# Altium PCB nrf_400708.PcbDoc (part 6 of 6)
Units mm, origin at the board's own origin, x right, y up, seen from the top; angles counter-clockwise.
Board outline 117 x 63.5 mm, 4 copper layers (Top Layer, Mid-Layer 1, Mid-Layer 2, Bottom Layer), stack 1.556 mm thick; 226 components, 168 nets, 912 pads, 2002 vias.
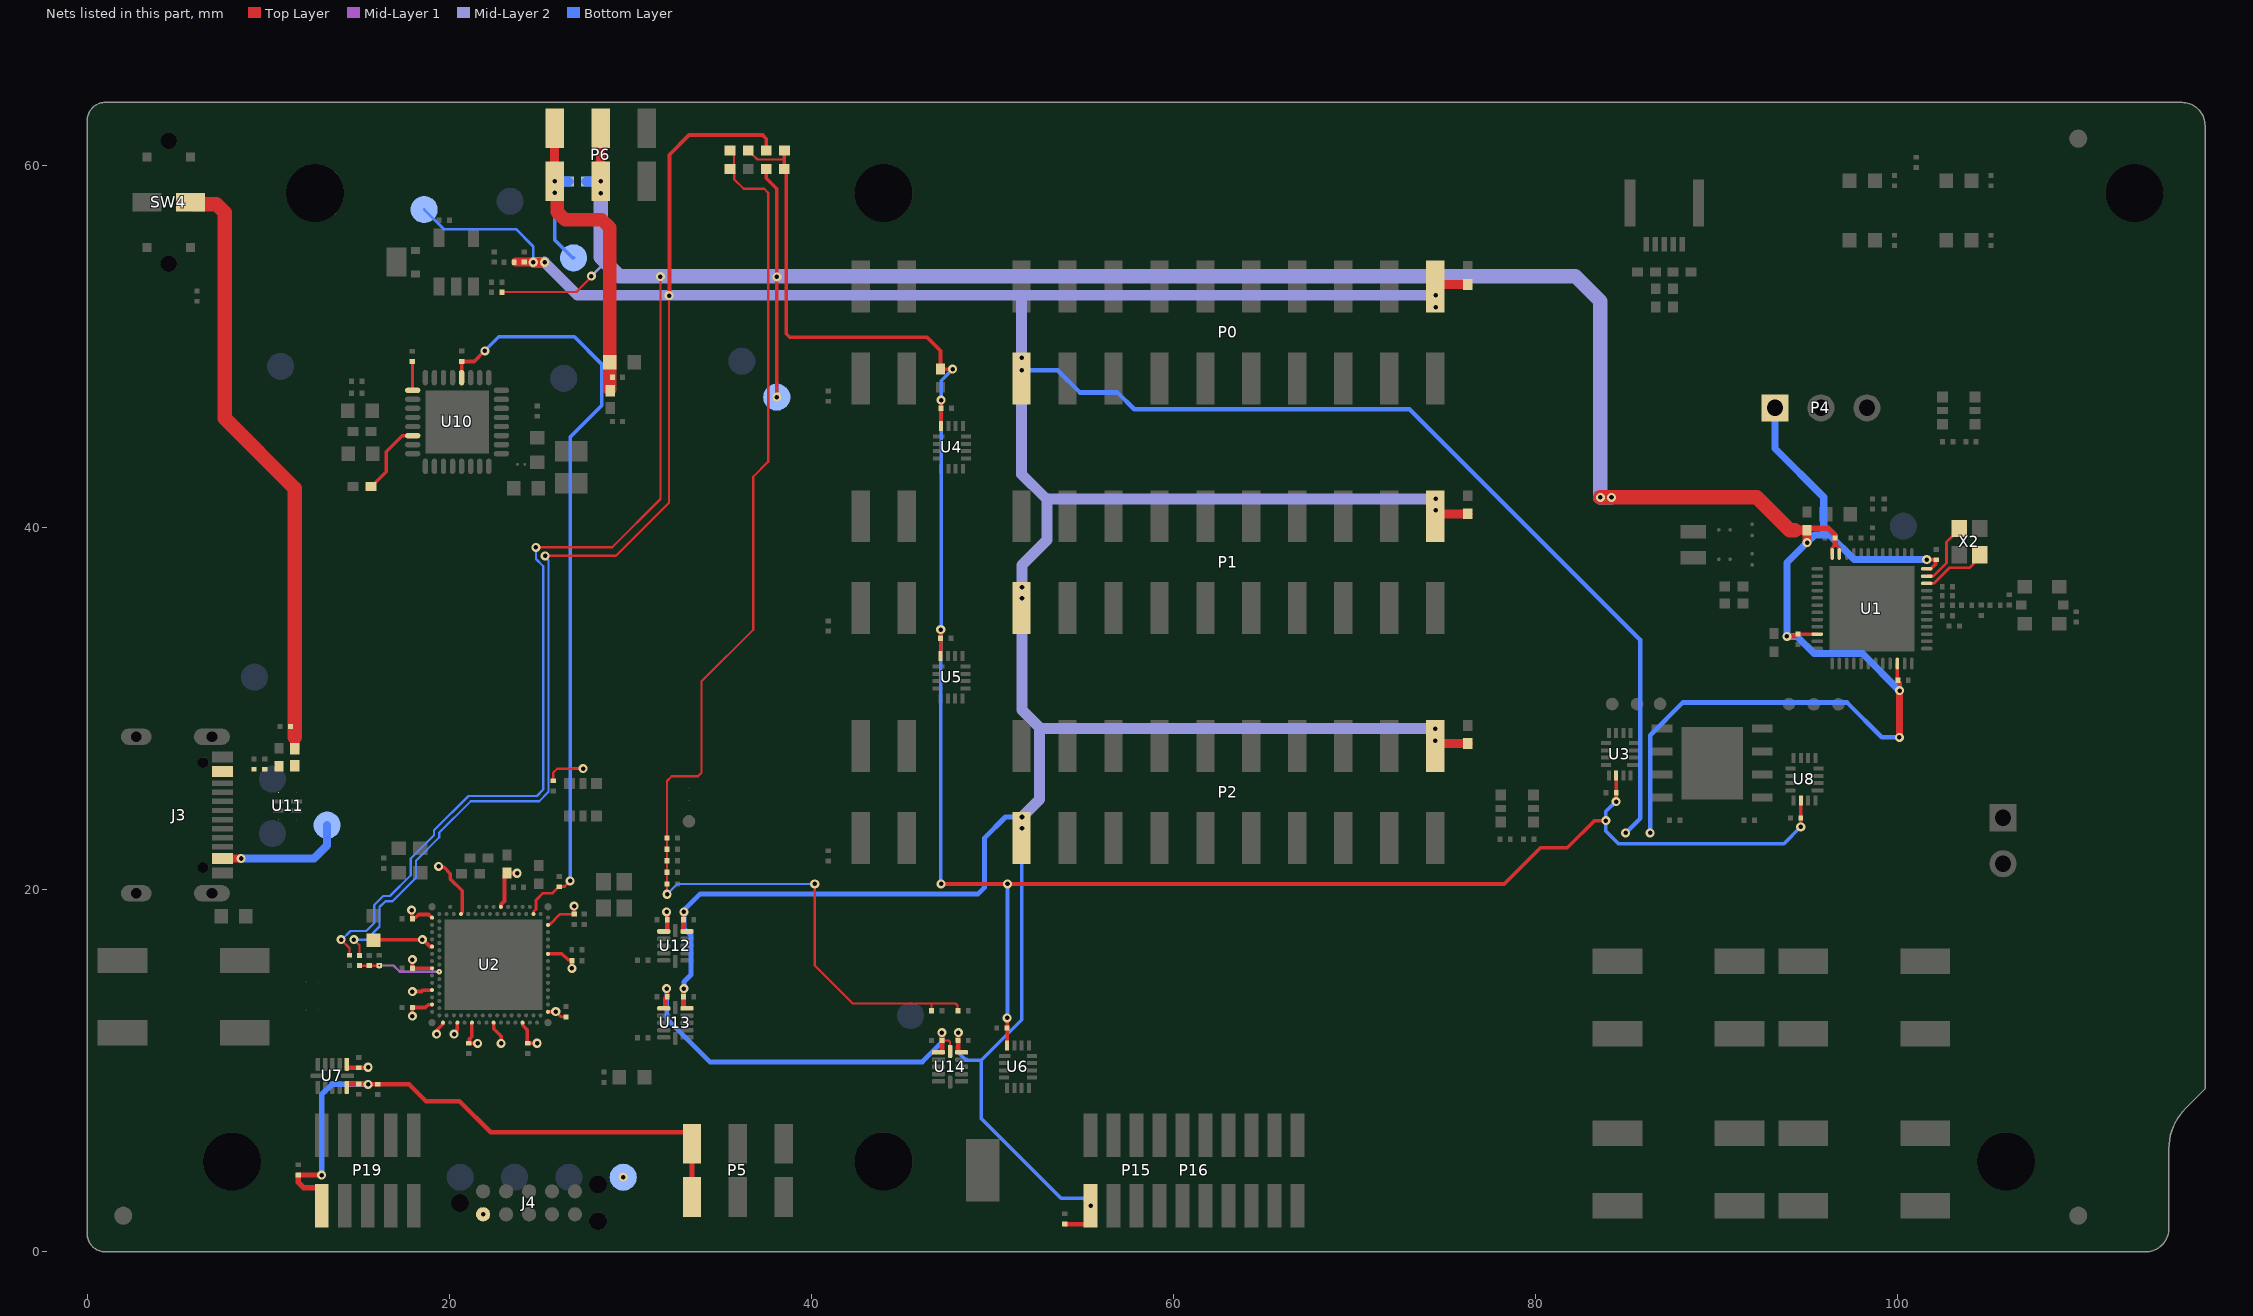
[diagram p6: the nets of this part, all layers, seen from the top]

## Via types
v1: diameter 0.5, hole 0.25, Top Layer to Bottom Layer, tented both sides, 1905 vias
v2: diameter 0.3, hole 0.1, Top Layer to Mid-Layer 1, tented top, 77 vias
v3: diameter 0.3, hole 0.1, Top Layer to Mid-Layer 1, tented both sides, 20 vias

## Nets (pads, with @x,y where several pads share a name; then routed paths per layer and width w, separated by ;. In a path a pad name is that pad's centre, name@x,y a point inside that pad or via, vN(x,y) a via of type N, cw(c..) or ccw(c..) an arc to the next point about the centre after c; other vN are vias at no path point) (continued)
VBUS:IN1: C30.1 C47.2 C48.2 FB2.1 J3.A4 J3.A9 TP16.1 U11.1 | length 7.2
  Top Layer w0.45: J3.A9@7.485,21.734 7.487,21.732 v1(8.517,21.732)
  Bottom Layer w0.45: v1(8.517,21.732) 8.519,21.73 12.548,21.73 13.263,22.446 TP16.1@13.263,23.571
VBUS:IN2: C46.2 FB2.2 SW4.5 | length 33.3
  Top Layer w0.5: FB2.2@11.475,27.8 11.475,28.423
  Top Layer w0.8: SW4.5@5.721,57.988 5.821,57.888 7.131,57.888 7.6,57.42 7.6,46.05 11.475,42.175 11.475,29.025 11.475,28.423
VBUSOUT: C68.2 U10.22 | length 4.1
  Top Layer w0.2: C68.2@15.702,42.275 16.525,43.098 16.525,44.202 17.408,45.086 17.981,45.086 U10.22@17.992,45.096
VDD: C25.2 C58.1 FB3.2 P6.3 R24.2 TP9.1 | length 22.4
  Top Layer w0.3: v1(25.832,58.5) v1(25.832,59.141)
  Top Layer w0.5: v1(25.832,59.141) P6.3@25.832,62.071
  Top Layer w0.75: v1(25.832,58.5) 25.888,58.5 25.967,58.421 25.967,57.464 26.406,57.025 28.436,57.025 28.875,56.586 C58.1@28.875,49.139 ; FB3.2@28.887,47.665 28.887,48.321 C58.1@28.887,49.139
  Bottom Layer w0.2: v1(25.832,58.5) 25.832,55.901 26.818,54.915 TP9.1@26.877,54.915
  Bottom Layer w0.55: v1@25.826,59.141 v1(25.832,59.141) ; v1(25.832,58.5) v1(25.832,59.141) ; R24.2@26.599,59.141 v1(25.832,59.141)
VDD:DBGR: C13.1 C18.1 C20.1 C22.1 C29.1 C31.1 C34.1 C35.1 C36.1 C37.1 C40.1 C53.2 C74.1 C76.1 C78.1 J4.1 R6.2 R8.2 TP3.1 U2.A19 U2.AC1 U2.AG1 U2.AJ31 U2.AL3 U2.AL7 U2.AL11 U2.AL17 U2.AL25 U2.B8 U2.B28 U2.C1 U2.E31 U2.L1 U2.N31 U2.U1 U7.1 U10.12 U12.1 U13.1 U14.1 U14.12 | length 96.4
  Top Layer w0.125: R8.2@25.76,26.025 25.76,26.479 25.975,26.694 v1(27.4,26.694) ; C78.1@47.224,11.679 47.602,11.679 47.675,11.606 U14.12@47.675,11.075
  Top Layer w0.15: U2.B28@24.66,18.664 24.675,18.679 24.675,18.801 24.798,18.925 24.798,19.204 24.798,19.427 25.185,19.815 25.722,19.815 26.081,20.174 C37.1@26.096,20.174 26.11,20.188 26.383,20.188 v1(26.685,20.49) ; U2.E31@25.443,18.079 25.562,18.079 25.824,18.341 25.824,18.364 26.102,18.642 26.125,18.642 26.134,18.651 26.899,18.651 C36.1@26.909,18.661 ; v1(25.893,13.271) 26.173,12.991 26.454,12.991 R6.2@26.46,12.986
  Top Layer w0.187: v1(19.425,21.3) 19.485,21.24 19.735,21.24 20.075,20.9 20.075,20.6 20.735,19.94 20.735,18.75 20.66,18.675 U2.B8@20.66,18.664 ; U2.N31@25.46,16.464 26.236,16.464 26.572,16.128 C35.1@26.691,16.128
  Top Layer w0.2: C40.1@16.018,17.25 v1(18.525,17.25) 18.562,17.25 18.943,16.869 19.055,16.869 U2.L1@19.06,16.864 ; v1(17.925,18.875) 17.949,18.851 17.949,18.426 C13.1@17.974,18.401 17.974,18.416 18.009,18.451 18.134,18.451 18.325,18.642 18.883,18.642 U2.C1@19.06,18.464 ; v1(17.968,13.03) 17.968,13.471 17.98,13.471 18.009,13.499 18.682,13.499 18.842,13.66 19.055,13.66 U2.AG1@19.06,13.664 ; v1(17.968,14.381) 17.976,14.388 18.481,14.388 18.558,14.464 U2.AC1@19.06,14.464 ; C18.1@17.974,15.63 v1@17.974,16.149 ; C18.1@17.979,15.664 U2.U1@19.06,15.664 ; v1(19.314,12.026) 19.372,12.083 19.372,12.296 19.655,12.58 19.655,12.66 U2.AL3@19.66,12.664 ; v1(20.279,12.026) 20.279,12.107 20.46,12.288 U2.AL7@20.46,12.664 ; U10.12@20.7,48.304 C29.1@20.7,49.19 21.39,49.19 v1(21.975,49.775) ; C22.1@21.092,11.524 21.127,11.559 21.13,11.559 21.13,11.759 21.26,11.889 U2.AL11@21.26,12.664 ; C22.1@21.101,11.521 21.572,11.521 v1(21.575,11.518) ; U2.AL17@22.46,12.664 22.46,12.334 22.878,11.916 v1(22.878,11.518) ; U2.AL25@24.06,12.664 24.065,12.66 24.065,12.514 24.318,12.261 24.318,11.549 C34.1@24.343,11.524 24.346,11.521 24.856,11.521 v1(24.86,11.525) ; U2.AJ31@25.46,13.264 25.887,13.264 v1(25.893,13.271) ; C35.1@26.691,16.128 26.748,16.128 26.783,16.093 C35.1@26.783,16.078 v1(26.782,15.659)
  Top Layer w0.203: v1(26.907,19.101) 26.909,19.1 C36.1@26.909,18.661
  Top Layer w0.225: U2.A19@22.86,19.064 22.86,19.179 23.073,19.392 23.073,20.848 C31.1@23.15,20.924 ; C31.1@23.2,20.916 v1(23.759,20.916)
  Top Layer w0.27: U7.1@14.362,10.174 C53.2@15.004,10.174 15.499,10.174 v1(15.525,10.2) ; v1(32.023,14.539) 32.051,14.51 C76.1@32.051,14.104 31.948,14.001 31.948,13.564 U13.1@32.051,13.462 ; v1(32.023,18.789) 32.051,18.76 C74.1@32.051,18.354 U12.1@32.051,17.712 ; U14.1@47.226,11.037 C78.1@47.224,11.679 v1(47.226,12.114)
  Mid-Layer 1 w0.2: v1@21.541,11.484 v1(21.575,11.518) v1@21.632,11.461
  Bottom Layer w0.125: 26.685,26.694 v1(27.4,26.694)
  Bottom Layer w0.2: v1(21.575,11.518) v1@21.656,11.518 ; v1(21.975,49.775) 22.75,50.55 26.925,50.55 28.425,49.05 28.425,46.739 26.685,44.999 26.685,26.694 v1(26.685,20.49)
  Bottom Layer w0.27: v1(32.023,14.539) 32.023,12.876 34.4,10.498 46.148,10.498 47.226,11.576 v1(47.226,12.114)
  other v1: 21.878,2.074 29.62,4.125 17.975,16.15
VDD:IO: C16.2 C28.2 C51.2 C63.2 C75.1 C77.1 C79.1 P0.1 P0.20 P1.1 P1.20 P2.1 P2.20 P15.1 P16.1 R9.2 R25.1 R37.2 R41.2 SB9.1 TP11.1 U12.11 U13.11 U14.11 | length 319.5
  Top Layer w0.125: v1(14.742,17.25) 15.053,16.939 R41.2@15.053,16.384 ; v1(25.3,38.45) 29.209,38.45 32.15,41.391 v1(32.15,52.825)
  Top Layer w0.2: R37.2@24.142,54.675 R37.2@24.144,54.672 ; v1@24.647,54.672 v1(24.65,54.67) ; v1(32.15,52.825) 32.175,52.85 32.175,60.615 33.26,61.7 37.318,61.7 37.525,61.493 R25.1@37.525,60.85
  Top Layer w0.25: C63.2@54,1.54 55.438,1.54 v1(55.438,2.55) ; P0.20@74.484,53.34 P0.20@74.484,54.215 ; v1(74.485,28.243) P2.20@74.485,28.815 ; v1(74.504,40.97) P1.20@74.504,41.515
  Top Layer w0.27: U13.11@32.948,13.514 32.952,14.094 32.952,14.516 v1(32.975,14.539) ; U12.11@32.948,17.764 C75.1@32.948,18.354 v1@32.948,18.789 ; U14.11@48.123,11.089 48.127,11.679 v1(48.13,12.114) C79.1@48.123,11.679
  Top Layer w0.5: R9.2@23.669,54.674 R37.2@24.142,54.675 24.645,54.674 v1@24.647,54.672 ; v1@24.652,54.672 v1(25.278,54.672) ; P0.20@74.484,53.34 74.594,53.45 C28.2@76.275,53.45 ; P2.20@74.594,28.076 C51.2@76.275,28.076 ; P1.20@74.594,40.775 C16.2@76.275,40.775
  Mid-Layer 2 w0.6: v1(24.65,54.67) 24.652,54.672 v1(25.278,54.672) ; v1@25.275,54.675 v1(25.278,54.672) ; v1@32.125,52.85 27.1,52.85 v1(25.278,54.672) ; v1@32.17,52.845 v1(74.51,52.845) v1@74.51,52.21 ; 51.629,52.825 v1(51.629,49.403) v1(51.629,48.712) 51.629,42.961 52.904,41.686 ; v1@51.644,23.4 51.644,23.377 v1@51.649,23.381 ; v1(51.65,23.4) v1(51.65,24.025) 52.625,25 52.625,28.871 ; v1(51.65,36.1) 51.649,29.933 52.677,28.905 ; v1(51.65,36.1) v1(51.65,36.725) 51.65,37.95 53.025,39.325 53.025,41.613 ; 52.709,28.905 v1(74.484,28.905) ; 53.055,41.595 v1(74.504,41.595) v1(74.504,40.97) ; v1(74.485,28.243) v1(74.484,28.905)
  Bottom Layer w0.125: v1(14.742,17.25) 15.438,17.25 16.162,17.974 16.162,19.049 16.488,19.375 16.875,19.375 18.175,20.675 18.175,21.614 19.462,22.901 19.462,23.167 21.195,24.9 24.975,24.9 25.488,25.413 25.488,38.189 25.3,38.377 v1(25.3,38.45)
  Bottom Layer w0.15: TP11.1@18.622,57.582 19.704,56.5 23.7,56.5 24.65,55.55 v1(24.65,54.67)
  Bottom Layer w0.2: v1(48.13,12.114) 48.13,11.009 48.554,10.585 49.4,10.585 ; v1@51.644,24.025 51.644,12.83 49.4,10.585 ; v1(55.438,2.55) 55.03,2.958 53.809,2.958 49.4,7.368 49.4,10.585
  Bottom Layer w0.25: v1(51.629,48.712) 53.613,48.712 54.85,47.475 56.925,47.475 57.85,46.55 73.057,46.55 85.8,33.807 85.8,23.945 v1(84.997,23.142)
  Bottom Layer w0.27: v1(32.975,14.539) 32.979,14.543 32.979,14.92 33.363,15.304 33.363,17.5 32.975,17.889 v1(32.975,18.789) 32.975,18.875 33.875,19.775 49.225,19.775 49.575,20.125 49.575,22.859 50.741,24.025 51.644,24.025 v1(51.65,24.025)
  other v1: 74.5,52.175
VDD:nRF: C3.2 C4.1 C7.1 C8.1 C11.1 P4.1 P6.2 R23.2 R24.1 R28.1 R43.1 SB10.1 TP1.1 U1.10 U1.22 U1.36 U1.47 U1.48 | length 219.6
  Top Layer w0.125: v1(14.04,17.25) 14.5,16.79 R23.2@14.5,16.385 ; R43.1@22.92,53.025 27.025,53.025 v1@27.894,53.894 ; v1(24.8,38.925) 29.013,38.925 31.675,41.587 v1(31.675,53.875)
  Top Layer w0.2: R28.1@37.519,59.83 37.519,59.31 38.104,58.725 v1(38.104,53.863) v1(38.104,47.219) ; C7.1@94.503,34.134 C7.1@94.518,34.134 ; C7.1@94.523,34.13 U1.10@95.58,34.13 ; U1.48@96.405,38.555 96.405,38.906 96.581,39.082 ; C11.1@96.542,39.474 C11.1@96.577,39.439 ; 96.597,39.098 96.805,38.889 U1.47@96.805,38.555 ; C8.1@100.005,31.568 U1.22@100.005,32.505 ; C8.1@100.034,31.518 C8.1@100.034,31.533 ; U1.36@101.63,37.73 101.855,37.73 101.855,37.732 102.114,37.99 C4.1@102.114,38.178 ; v1(101.63,38.244) 101.639,38.235 102.126,38.235 C4.1@102.149,38.213
  Top Layer w0.25: v1(93.909,34.002) 93.931,34.024 94.393,34.024 C7.1@94.503,34.134 ; C8.1@100.034,31.518 100.132,31.42 v1(100.132,31.005)
  Top Layer w0.3: v1(28.372,58.493) v1(28.372,59.141) ; C3.2@95.128,39.966 96.196,39.966 96.581,39.58 96.581,39.082 ; v1@100.125,30.998 v1(100.132,31.005)
  Top Layer w0.4: v1(100.125,28.425) v1@100.125,30.998
  Top Layer w0.5: v1(28.372,59.141) P6.2@28.372,62.071 ; v1(95.017,39.186) C3.2@95.017,39.867
  Top Layer w0.55: 94.35,39.867 C3.2@95.017,39.867
  Top Layer w0.8: v1(83.607,41.68) v1(84.216,41.68) 92.245,41.68 94.058,39.867 94.35,39.867
  Mid-Layer 2 w0.15: v1(27.862,53.9) 28.372,54.41 28.372,54.937
  Mid-Layer 2 w0.8: v1(28.372,59.141) v1(28.372,58.493) 28.372,54.937 29.409,53.9 v1@31.65,53.9 ; v1@31.7,53.9 82.225,53.9 83.607,52.518 v1(83.607,41.68) v1(84.216,41.68)
  Bottom Layer w0.125: v1(14.04,17.25) 14.075,17.25 14.55,17.725 15.425,17.725 15.871,18.171 15.871,19.169 16.367,19.665 16.739,19.665 17.881,20.807 17.881,21.731 19.171,23.021 19.171,23.287 21.075,25.19 24.854,25.19 25.202,25.538 25.202,37.873 24.8,38.275 v1(24.8,38.925)
  Bottom Layer w0.25: v1(86.347,23.142) 86.347,28.547 88.15,30.35 97.225,30.35 99.15,28.425 v1(100.125,28.425)
  Bottom Layer w0.3: 93.909,35.496 93.921,35.484
  Bottom Layer w0.4: P4.1@93.245,46.625 93.245,44.38 95.935,41.69 95.935,39.606 ; v1(93.909,34.002) 94.465,34.002 95.412,33.055 98.081,33.055 v1(100.132,31.005) ; v1@93.909,34.048 93.909,35.496 93.909,38.078 v1(95.017,39.186) 95.437,39.606 95.935,39.606 ; v1@101.603,38.244 97.62,38.244 96.258,39.606 95.935,39.606
  Bottom Layer w0.55: R24.1@27.599,59.141 v1(28.372,59.141) v1(28.372,58.493)
VDD:SW: C10.1 C15.1 C49.1 C50.2 C65.1 C66.1 R25.2 R28.2 R29.2 U3.14 U4.16 U5.16 U6.16 U8.14 | length 118.2
  Top Layer w0.125: R29.2@36.525,60.85 36.55,60.85 36.762,60.638 36.762,60.613 37.034,60.341 38.519,60.341 ; R25.2@38.287,60.638 38.5,60.85 R25.2@38.525,60.85
  Top Layer w0.2: R28.2@38.519,59.83 38.519,60.341 R25.2@38.519,60.836 ; R28.2@38.625,59.83 38.625,50.727 38.827,50.525 46.4,50.525 47.15,49.775 C50.2@47.15,48.769 v1(47.819,48.769) ; U5.16@47.16,32.911 47.16,33.911 47.154,33.917 47.154,34.369 v1(47.16,34.375) ; v1(47.178,20.325) v1(50.849,20.325) 78.288,20.325 80.288,22.325 81.775,22.325 83.275,23.825 v1(83.9,23.825) ; U4.16@47.178,45.612 47.178,46.603 C10.1@47.182,46.607 v1(47.182,47.056) ; U6.16@50.825,11.4 C49.1@50.825,12.369 v1(50.825,12.925) ; v1(84.47,24.878) 84.47,25.365 84.475,25.371 U3.14@84.475,26.325 ; v1(94.67,23.479) 94.67,23.965 94.675,23.971 U8.14@94.675,24.925
  Bottom Layer w0.2: v1@47.164,20.325 47.164,34.371 v1(47.16,34.375) 47.182,34.396 v1(47.182,47.056) 47.182,48.131 v1(47.819,48.769) ; v1(50.825,12.925) 50.849,12.949 v1(50.849,20.325) ; v1@84.462,24.887 83.9,24.325 v1(83.9,23.825) 83.9,23.25 84.6,22.55 93.741,22.55 v1(94.67,23.479)
VDD:SW_PU: R13.1 R14.1 R15.1 R16.1 R17.2 R29.1 R30.1 R31.1 R35.2 | length 68.4
  Top Layer w0.125: v1(32.04,19.756) R13.1@32.04,20.325 R15.1@32.04,21.605 R16.1@32.04,22.237 R35.2@32.04,22.864 ; R35.2@32.04,22.9 32.04,26.015 32.3,26.275 33.75,26.275 33.95,26.475 33.95,31.525 36.8,34.375 36.8,42.828 37.625,43.653 37.625,58.516 37.416,58.725 36.275,58.725 35.751,59.249 35.751,59.617 35.539,59.83 R30.1@35.525,59.83 35.533,59.83 35.746,60.042 35.746,60.638 35.533,60.85 R29.1@35.525,60.85 ; v1(40.2,20.325) 40.2,15.825 42.3,13.725 46.656,13.725 ; R17.2@46.654,13.325 46.654,13.723 46.656,13.725 ; R31.1@48.11,13.325 48.09,13.345 48.09,13.609 47.974,13.725 46.656,13.725
  Bottom Layer w0.125: v1(32.04,19.756) 32.609,20.325 v1(40.2,20.325)
VDD:SWD0: C14.1 C73.2 P5.3 P19.1 R18.2 U7.11 | length 34.7
  Top Layer w0.15: v1(15.525,9.25) v1@15.531,9.256 ; R18.2@16.058,9.256 R18.2@16.064,9.262
  Top Layer w0.25: v1(15.525,9.25) 16.058,9.25 17.8,9.25 18.725,8.325 20.575,8.325 22.3,6.6 33.035,6.6 33.42,6.215 P5.3@33.42,5.965 P5.3@33.42,3.035
  Top Layer w0.27: U7.11@14.411,9.275 14.414,9.277 C14.1@15.004,9.277 15.498,9.277 v1(15.525,9.25)
  Top Layer w0.3: P19.1@12.964,2.55 12.964,3.32 12.734,3.55 11.964,3.55 11.679,3.835 C73.2@11.679,4.246 v1(12.964,4.246)
  Bottom Layer w0.3: v1(12.964,4.246) 12.964,8.689 13.525,9.25 v1(15.525,9.25)
VMEAS_CH1: C67.1 R41.1 R42.2 U2.V2 | length 4.5
  Top Layer w0.125: R41.1@15.053,15.814 16.143,15.814 v2(16.145,15.815)
  Mid-Layer 1 w0.125: v2(16.145,15.815) 16.935,15.815 17.27,15.48 v2(19.46,15.48)
VSET1: R26.1 U10.17 | length 1.9
  Top Layer w0.15: U10.17@17.742,47.665 17.811,47.596 U10.17@17.992,47.596 17.974,47.614 R26.1@17.974,49.183
XC1: U1.34 X2.1 | length 3.6
  Top Layer w0.15: U1.34@101.691,36.94 102.028,36.94 102.875,37.786 103.993,37.786 104.218,38.011 104.218,38.159 X2.1@104.568,38.509
XC2: U1.35 X2.3 | length 3.6
  Top Layer w0.15: U1.35@101.63,37.33 101.64,37.34 102.004,37.34 102.723,38.058 102.723,39.209 103.068,39.554 103.068,39.609 X2.3@103.418,39.959
pads on no net: Fid1.0 Fid2.0 Fid3.0 J3. J3.0 J3.A8 J3.B8 J4.0 J4.6 J4.7 J4.8 J4.9 J7.0 J7.1 J7.3 J7.5 P0.8 P0.9 P0.10 P0.11 P0.12 P0.13 P0.14 P0.15 P0.16 P0.17 P0.18 P1.18 P2.14 P2.15 P2.16 P2.17 P2.18 P5.2 P15.7 P15.8 P16.7 P16.8 P16.11 P16.13 P19.7 P19.8 P19.9 P30.3 P31.3 P32.3 SW4.0 SW4.1 SW4.6 U2. U2.A1 U2.A21 U2.A31 U2.AD2 U2.AE31 U2.AG31 U2.AH2 U2.AK2 U2.AK4 U2.AK6 U2.AK8 U2.AK10 U2.AK12 U2.AK14 U2.AK22 U2.AK24 U2.AK26 U2.AK28 U2.AK30 U2.AL1 U2.AL31 U2.B10 U2.D2 U2.F2 U2.J1 U2.K2 U2.M2 U2.P2 U2.T2 U2.Y2 U4.7 U4.12 U5.7 U5.12 U6.7 U6.12 U10.5 U10.7 U10.9 U10.10 U10.11 U10.15 U10.18 U10.19 U10.25 U10.26 U10.27 U11.4

## Polygon pours and split planes (outlines as drawn)
P5V0 on Top Layer "P5V0" (solid, remove dead copper, pour order 0): 16.496,48.5 16.496,50.01 17.748,51.263 17.748,59.646 17.294,60.1 14.15,60.1 10.475,56.425 10.475,49.451 11.426,48.5
GND on Top Layer "GND_island" (solid, pour order 4): 103.874,35.423 103.874,34.914 104.306,34.482 104.991,34.482 105.397,34.888 105.397,35.422
GND on Top Layer "Top_Layer-GND" (solid, remove dead copper, pour order 10): 0.002,0.009 0.002,63.509 117.004,63.509 117.004,0.009
GND on Mid-Layer 1 "Mid_Layer1-GND" (solid, remove dead copper, pour order 1): 0.029,0 0.029,63.22 117.004,63.22 117.004,0
GND on Bottom Layer "Bottom_Layer-GND" (solid, remove dead copper, pour order 3): 0.029,0 0.029,63.5 117.004,63.5 117.004,0
VDD:DBGR on Mid-Layer 2 "VDD_DBGR" (solid, pour order 6): 21.754,1.825 25.2,1.825 26.025,2.65 29.176,2.65 30.011,3.485 30.011,4.789 28.85,5.95 28.85,11 32.25,14.4 32.25,18.875 29.675,21.45 19,21.45 17.725,20.175 17.725,14.809 15.175,12.259 15.175,10.025 15.325,9.875 21.219,3.981 21.219,2.36
GND on Mid-Layer 2 "Mid_Layer2-GND" (solid, remove dead copper, pour order 7): 0.029,0 0.029,63.5 117.004,63.5 117.004,0

## Keep-outs
Top Layer:
  region: 112,26.473 cw(c112,29.973) 108.5,29.973 cw(c112,29.973) 112,33.473 cw(c112,29.973) 115.5,29.973 cw(c112,29.973)
  region: 108.496,6.473 cw(c108.496,9.973) 104.996,9.973 cw(c108.496,9.973) 108.496,13.473 cw(c108.496,9.973) 111.996,9.973 cw(c108.496,9.973)
  region: 42.496,14.473 cw(c42.496,17.973) 38.996,17.973 cw(c42.496,17.973) 42.496,21.473 cw(c42.496,17.973) 45.996,17.973 cw(c42.496,17.973)
  region: 74.996,0.473 cw(c74.996,3.973) 71.496,3.973 cw(c74.996,3.973) 74.996,7.473 cw(c74.996,3.973) 78.496,3.973 cw(c74.996,3.973)
  region: 3.496,-0.027 cw(c3.496,3.473) -0.004,3.473 cw(c3.496,3.473) 3.496,6.973 cw(c3.496,3.473) 6.996,3.473 cw(c3.496,3.473)
  region: 20.496,33.473 cw(c20.496,36.973) 16.996,36.973 cw(c20.496,36.973) 20.496,40.473 cw(c20.496,36.973) 23.996,36.973 cw(c20.496,36.973)
  region: 16.496,56.973 cw(c16.496,60.473) 12.996,60.473 cw(c16.496,60.473) 16.496,63.973 cw(c16.496,60.473) 19.996,60.473 cw(c16.496,60.473)
  region: 35.496,52.473 cw(c35.496,55.973) 31.996,55.973 cw(c35.496,55.973) 35.496,59.473 cw(c35.496,55.973) 38.996,55.973 cw(c35.496,55.973)
  region: 77.796,54.973 cw(c77.796,58.473) 74.296,58.473 cw(c77.796,58.473) 77.796,61.973 cw(c77.796,58.473) 81.296,58.473 cw(c77.796,58.473)
  region: 46.352,19.687 ccw(c49.352,19.687) 49.352,16.687 ccw(c49.352,19.687) 52.352,19.687 ccw(c49.352,19.687) 49.352,22.687 ccw(c49.352,19.687)
  region: 8.004,2 cw(c8.004,5) 5.004,5 cw(c8.004,5) 8.004,8 cw(c8.004,5) 11.004,5 cw(c8.004,5)
  region: 44.004,2 cw(c44.004,5) 41.004,5 cw(c44.004,5) 44.004,8 cw(c44.004,5) 47.004,5 cw(c44.004,5)
  region: 106.005,1.979 cw(c106.005,4.979) 103.005,4.979 cw(c106.005,4.979) 106.005,7.979 cw(c106.005,4.979) 109.005,4.979 cw(c106.005,4.979)
  region: 98.967,25.576 cw(c98.967,28.576) 95.967,28.576 cw(c98.967,28.576) 98.967,31.576 cw(c98.967,28.576) 101.967,28.576 cw(c98.967,28.576)
  region: 113.104,55.5 cw(c113.104,58.5) 110.104,58.5 cw(c113.104,58.5) 113.104,61.5 cw(c113.104,58.5) 116.104,58.5 cw(c113.104,58.5)
  region: 44.004,55.5 cw(c44.004,58.5) 41.004,58.5 cw(c44.004,58.5) 44.004,61.5 cw(c44.004,58.5) 47.004,58.5 cw(c44.004,58.5)
  region: 16.439,59.569 cw(c16.439,62.569) 13.439,62.569 cw(c16.439,62.569) 16.439,65.569 cw(c16.439,62.569) 19.439,62.569 cw(c16.439,62.569)
Keep-Out Layer:
  circle w0.152: c12.604,58.5 r2.4
  circle w0.152: c113.104,58.5 r2.4
  circle w0.152: c113.104,58.5 r2.4
  circle w0.152: c106.004,5 r2.4
  circle w0.152: c44.004,5 r2.4
  circle w0.152: c44.004,58.5 r2.4
  circle w0.152: c8.004,5 r2.4

## Other copper
Top Layer:
  rectangle net GND: 6.919,27.025 8.804,27.85
  rectangle net GND: 109.224,34.036 110.038,34.931
  rectangle net GND: 6.891,20.422 8.776,21.247
  rectangle net ANT: 115.025,16.986 116.295,17.748
  pour cut-out: 8.2,23.75 10.573,23.75 10.573,24.279 8.2,24.279 8.2,24.047
  pour cut-out: 25.839,43.656 25.839,43.016 27.809,43.016 27.809,43.656
  region net RF: 106.555,35.98 106.35,35.865 106.35,35.595 106.555,35.48
  region net PVSS1: 22.892,44.446 23.264,44.446 23.499,44.211 23.499,43.936 23.199,43.636 23.199,41.786 23.949,41.786 23.949,42.536 24.65,43.237 25.267,43.237 25.267,43.996 24.164,43.996 23.414,44.746 22.892,44.746
  region net P5V0: 15.382,45.946 15.382,48.629 17.367,48.629 17.367,46.334 17.454,46.246 18.042,46.246 18.042,45.946
  region net NetC27_2: 24.549,42.586 25.69,42.586 25.817,42.713 25.817,43.016 27.652,43.016 27.652,41.589 27.474,41.411 24.549,41.411
  region net P5V0: 23.603,45.459 24.467,44.596 25.267,44.596 25.267,46.296 24.167,46.296 23.604,45.733
  region net NetC59_1: 7.89,19.8 7.89,18.1 5.902,18.1 5.902,19.8
  pour cut-out: 103.874,35.423 103.874,34.914 104.306,34.482 104.991,34.482 105.398,34.889 105.397,34.889 105.397,35.423 105.547,35.423 105.547,34.802 105.065,34.32 104.227,34.32 103.719,34.828 103.719,35.423
  region net VBUS:IN1: 11.725,27.175 11.725,26.525 10.879,26.525 10.879,25.283 10.101,25.283 9.725,25.659 9.725,26.15 9.641,26.234 6.876,26.234 6.719,26.077 6.719,22.178 6.864,22.034 8.059,22.034 8.059,21.434 6.873,21.434 5.95,22.357 5.95,25.875 6.909,26.834 9.937,26.834 10.232,26.539 10.232,25.828 10.577,25.483 10.679,25.483 10.679,25.554 10.35,25.883 10.35,27.175
  region net NetL2_1: 102.387,35.879 101.998,35.829 101.998,35.63 102.387,35.579
  pour cut-out: 99.09,39.615 98.278,39.615 98.278,41.467 99.09,41.467
  pour cut-out: 96.858,41.292 96.649,41.292 96.649,41.179 96.858,41.179
  pour cut-out: 105.311,40.732 105.311,37.477 102.443,37.477 102.443,40.732
  pour cut-out: 102.811,36.895 102.811,36.591 102.923,36.591 102.923,36.895
Mid-Layer 1:
  pour cut-out: 33.851,25.048 32.651,25.048 32.651,25.54 33.851,25.54
  pour cut-out: 85.597,23.262 84.397,23.262 84.397,23.754 85.597,23.754
  pour cut-out: 110.038,37.125 106.927,37.125 106.302,36.5 102.775,36.5 102.775,35.324 103.7,35.324 103.7,34.95 106.302,34.95 106.927,34.325 110.038,34.325
  pour cut-out: 103.719,35.318 103.719,34.828 104.227,34.32 105.065,34.32 105.547,34.802 105.547,35.318
  pour cut-out: 89.779,39.161 89.779,40.616 91.141,40.616 91.141,39.161
  pour cut-out: 89.779,37.535 89.779,38.991 91.141,38.991 91.141,37.535
  pour cut-out: 12.225,12.775 12.225,13.975 12.717,13.975 12.717,12.775
Mid-Layer 2:
  region net P5V0: 25.168,45.289 25.278,45.415 25.278,46.113 22.766,48.625 16.8,48.625 16.8,47.005 16.93,46.875 18.454,46.875 19.029,47.45 21.896,47.45 22.125,47.221 22.125,45.396 22.233,45.287
  pour cut-out: 110.038,37.125 106.927,37.125 106.302,36.5 102.775,36.5 102.775,35.324 103.7,35.324 103.7,34.95 106.302,34.95 106.927,34.325 110.038,34.325
  pour cut-out: 103.719,35.318 103.719,34.828 104.227,34.32 105.065,34.32 105.547,34.802 105.547,35.318
Bottom Layer:
  pour cut-out: 19.572,57.582 cw(c18.62,57.582) 18.62,56.63 cw(c18.62,57.578) 17.672,57.578 17.672,57.589 cw(c18.613,57.589) 18.613,58.53 18.623,58.53 cw(c18.623,57.582)
  pour cut-out: 16.397,44.858 cw(c15.446,44.858) 15.446,43.906 cw(c15.446,44.854) 14.498,44.854 14.498,44.865 cw(c15.439,44.865) 15.439,45.806 15.449,45.806 cw(c15.449,44.858)
  pour cut-out: 20.072,29.999 cw(c19.12,29.999) 19.12,29.047 cw(c19.12,29.995) 18.172,29.995 18.172,30.006 cw(c19.113,30.006) 19.113,30.947 19.124,30.947 cw(c19.124,29.999)
  pour cut-out: 10.085,12.152 cw(c9.133,12.152) 9.133,11.2 cw(c9.133,12.149) 8.185,12.149 8.185,12.159 cw(c9.126,12.159) 9.126,13.1 9.137,13.1 cw(c9.137,12.152)
  pour cut-out: 23.027,54.815 cw(c22.075,54.815) 22.075,53.863 cw(c22.075,54.811) 21.127,54.811 21.127,54.822 cw(c22.068,54.822) 22.068,55.763 22.079,55.763 cw(c22.079,54.815)
  pour cut-out: 15.483,54.307 cw(c14.531,54.307) 14.531,53.355 cw(c14.531,54.303) 13.583,54.303 13.583,54.314 cw(c14.524,54.314) 14.524,55.255 14.535,55.255 cw(c14.535,54.307)
  pour cut-out: 32.984,37.568 cw(c32.032,37.568) 32.032,36.617 cw(c32.032,37.565) 31.084,37.565 31.084,37.576 cw(c32.025,37.576) 32.025,38.517 32.036,38.517 cw(c32.036,37.568)
  pour cut-out: 38.368,38.713 cw(c37.417,38.713) 37.417,37.761 cw(c37.417,38.71) 36.469,38.71 36.469,38.72 cw(c37.41,38.72) 37.41,39.661 37.42,39.661 cw(c37.42,38.713)
  pour cut-out: 39.869,42.397 cw(c38.918,42.397) 38.918,41.445 cw(c38.918,42.393) 37.969,42.393 37.969,42.404 cw(c38.911,42.404) 38.911,43.345 38.921,43.345 cw(c38.921,42.397)
  pour cut-out: 27.284,48.262 cw(c26.332,48.262) 26.332,47.31 cw(c26.332,48.258) 25.384,48.258 25.384,48.269 cw(c26.325,48.269) 26.325,49.21 26.336,49.21 cw(c26.336,48.262)
  pour cut-out: 14.213,38.847 cw(c13.261,38.847) 13.261,37.895 cw(c13.261,38.843) 12.313,38.843 12.313,38.854 cw(c13.254,38.854) 13.254,39.795 13.265,39.795 cw(c13.265,38.847)
  pour cut-out: 11.19,41.354 cw(c10.239,41.354) 10.239,40.403 cw(c10.239,41.351) 9.291,41.351 9.291,41.362 cw(c10.232,41.362) 10.232,42.303 10.242,42.303 cw(c10.242,41.354)
  pour cut-out: 11.19,38.354 cw(c10.239,38.354) 10.239,37.403 cw(c10.239,38.351) 9.291,38.351 9.291,38.362 cw(c10.232,38.362) 10.232,39.303 10.242,39.303 cw(c10.242,38.354)
  pour cut-out: 16.982,27.612 cw(c16.03,27.612) 16.03,26.66 cw(c16.03,27.608) 15.082,27.608 15.082,27.619 cw(c16.023,27.619) 16.023,28.56 16.034,28.56 cw(c16.034,27.612)
  pour cut-out: 22.747,27.434 cw(c21.796,27.434) 21.796,26.482 cw(c21.796,27.43) 20.848,27.43 20.848,27.441 cw(c21.789,27.441) 21.789,28.382 21.799,28.382 cw(c21.799,27.434)
  pour cut-out: 25.747,28.424 cw(c24.796,28.424) 24.796,27.473 cw(c24.796,28.421) 23.848,28.421 23.848,28.432 cw(c24.789,28.432) 24.789,29.373 24.799,29.373 cw(c24.799,28.424)
  pour cut-out: 28.747,28.424 cw(c27.796,28.424) 27.796,27.473 cw(c27.796,28.421) 26.848,28.421 26.848,28.432 cw(c27.789,28.432) 27.789,29.373 27.799,29.373 cw(c27.799,28.424)
  pour cut-out: 38.165,26.748 cw(c37.213,26.748) 37.213,25.796 cw(c37.213,26.744) 36.265,26.744 36.265,26.755 cw(c37.206,26.755) 37.206,27.696 37.217,27.696 cw(c37.217,26.748)
  pour cut-out: 38.165,21.748 cw(c37.213,21.748) 37.213,20.796 cw(c37.213,21.744) 36.265,21.744 36.265,21.755 cw(c37.206,21.755) 37.206,22.696 37.217,22.696 cw(c37.217,21.748)
  pour cut-out: 38.165,16.748 cw(c37.213,16.748) 37.213,15.796 cw(c37.213,16.744) 36.265,16.744 36.265,16.755 cw(c37.206,16.755) 37.206,17.696 37.217,17.696 cw(c37.217,16.748)
  pour cut-out: 38.165,11.748 cw(c37.213,11.748) 37.213,10.796 cw(c37.213,11.744) 36.265,11.744 36.265,11.755 cw(c37.206,11.755) 37.206,12.696 37.217,12.696 cw(c37.217,11.748)
Multi-Layer:
  pour cut-out: 110.035,0.028 117.023,0.028 116.971,63.5 110.041,63.5

## Silkscreen, mask and mechanical layers (free items; w line width, h text height)
Top Overlay:
  circle w0.15: c80.975,30.275 r1.13
  circle w0.15: c27.1,57.087 r0.884
  region: 79.619,29.08 79.619,30.304 cw(c80.99,30.304) 81.005,31.675 81.005,31.405 ccw(c80.994,30.35) 79.94,30.35 79.94,30.199 ccw(c80.994,30.199) 80.994,29.145 80.994,29.08
  region: 82.37,29.08 82.37,30.305 ccw(c81,30.304) 80.995,31.675 80.995,31.405 cw(c80.995,30.35) 82.05,30.35 82.05,30.2 cw(c80.995,30.2) 80.995,29.145 80.995,29.081
  region: 29.212,56.075 28.513,55.183 27.838,56.075
  region: 24.975,55.203 25.675,56.095 26.35,55.203
  lines w0.15: 15.875,41.75 15.875,40.767 29.075,40.767 29.075,45.4 ; 15.875,47.175 15.875,50.261 29.07,50.261 29.07,49.85 ; 15.879,15.3 15.879,11.244 20.675,11.244 ; 15.879,19.375 15.879,23.05 29.077,23.05 29.078,21.174 ; 21.539,11.244 23.851,11.244 ; 24.841,11.244 29.078,11.244 ; 29.075,11.244 29.075,18.288 ; 30.15,56.35 31.65,56.35 ; 30.45,56.1 31.35,56.1 ; 30.7,55.855 31.1,55.855 ; 30.9,56.35 30.9,57.1 ; 42.204,29.8 42.204,30.3 42.45,30.3 ; 42.204,42.5 42.204,43 42.45,43 ; 42.204,55.2 42.204,55.7 42.45,55.7 ; 45.559,30.3 45.804,30.3 45.804,29.8 ; 45.559,43 45.804,43 45.804,42.5 ; 45.559,55.7 45.804,55.7 45.804,55.2 ; 105.875,35.1 105.875,31.1 94,31.1 94,39.125 94,42.125 101.489,42.125 105.875,42.125 105.875,36.725
  lines w0.178: 25.668,56.32 25.668,56.5 ; 25.668,56.785 25.668,57.098 25.925,57.098 ; 28.275,57.1 28.525,57.1 28.525,56.787 ; 28.525,56.308 28.525,56.489
  lines w0.381: 54.103,0.699 cw(c54.183,0.6) 54.263,0.699
  text "ON" at 0.35,61.3 h1.4
  text "NFC" at 83.126,59.729 h1.8
  text "LED0" at 96.062,59.727 h1.8
  text "LED1" at 101.887,59.727 h1.8
  text "GPIO pins shown in parentheses are only available on headers with modification" at 50.325,59.25 h1.6
  text "VDD / CURRENT / MEASURE" at 16.649,58.208 h1.8
  text "A" at 26.65,56.65 h1.52
  text "LED2" at 96.087,56.427 h1.8
  text "LED3" at 101.887,56.427 h1.8
  text "GND" at 42.63,55.215 h1.52
  text "GND" at 49.725,55.2 h1.52
  text "01" at 53.565,55.209 h1.52
  text "03" at 55.965,55.209 h1.52
  text "VDD:IO" at 72.625,55.2 h1.52
  text "POWER" at 8.575,54.488 h1.8 r90
  text "OFF" at 0.35,53.425 h1.4
  text "IDD" at 26.125,52.9 h1.52 r90
  text "GND" at 31.375,52.125 h1.52 r90
  text "nRF54" at 28.925,51.4 h1.52 r90
  text "VDD:nRF" at 93.625,47.988 h1.27 r90
  text "DECD" at 96.181,47.964 h1.27 r90
  text "GND" at 98.708,47.964 h1.27 r90
  text "PORT P0" at 50.023,46.672 h1.8 r90
  text "P5V0" at 40.261,45.469 h1.52
  text "VDD:IO" at 48.625,45.475 h1.52
  text "00" at 53.487,45.475 h1.52
  text "02" at 56.008,45.47 h1.52
  text "04" at 58.548,45.47 h1.52
  text "GND" at 73.35,45.475 h1.52
  text "GND" at 42.63,42.515 h1.52
  text "GND" at 49.716,42.5 h1.52
  text "09" at 63.687,42.5 h1.52
  text "11" at 66.562,42.5 h1.52
  text "13" at 68.962,42.5 h1.52
  text "VDD:IO" at 72.625,42.5 h1.52
  text "05" at 58.523,42.493 h1.52
  text "07" at 61.063,42.493 h1.52
  text "(01)" at 53.25,42.25 h1.52
  text "(03)" at 55.625,42.25 h1.52
  text "nRF54L15" at 93.93,42.15 h1.8
  text "PMIC" at 15.799,39.042 h1.8
  text ".PCBNumber" at 0.598,38.543 h2.03
  text ".PCBRevision" at 0.598,37.381 h1.52
  text "PORT P1" at 50.023,33.972 h1.8 r90
  text "nRF54L15-DK" at 0.515,33.45 h3
  text "P5V0" at 40.261,32.769 h1.52
  text "VDD:IO" at 48.65,32.725 h1.52
  text "04" at 58.548,32.72 h1.52
  text "06" at 61.088,32.72 h1.52
  text "08" at 63.628,32.72 h1.52
  text "10" at 66.345,32.72 h1.52
  text "12" at 68.937,32.725 h1.52
  text "14" at 71.425,32.72 h1.52
  text "GND" at 73.287,32.725 h1.52
  text "(02)" at 55.675,32.475 h1.52
  text "(00)" at 53.075,32.45 h1.52
  text "VDD:IO" at 72.625,29.85 h1.52
  text "05" at 58.504,29.825 h1.52
  text "09" at 63.675,29.825 h1.52
  text "GND" at 42.63,29.815 h1.52
  text "GND" at 49.725,29.8 h1.52
  text "01" at 53.529,29.809 h1.52
  text "03" at 55.929,29.809 h1.52
  text "07" at 61.262,29.8 h1.52
  text "DEBUGGER" at 0.587,29.149 h1.8
  text "GND" at 79.619,27.898 h1.4
  text "nRF54" at 107.1,24.15 h1.27
  text "RESET" at 107.1,23.125 h1.27
  text "DEBUGGER" at 15.813,23.05 h1.8
  text "PORT P2" at 50.023,21.272 h1.8 r90
  text "GND" at 107.1,21.054 h1.27
  text "P5V0" at 40.261,20.069 h1.52
  text "VDD:IO" at 48.65,20.075 h1.52
  text "00" at 53.45,20.075 h1.52
  text "02" at 55.971,20.07 h1.52
  text "04" at 58.511,20.07 h1.52
  text "06" at 61.088,20.02 h1.52
  text "08" at 63.628,20.02 h1.52
  text "10" at 66.362,20.025 h1.52
  text "GND" at 73.275,20.025 h1.52
  text "BUTTON 0" at 83.896,17.287 h1.8
  text "BUTTON 1" at 94.146,17.287 h1.8
  text "RESET" at 1.397,9.242 h1.8
  text "DEBUG IN/ TRACE" at 56.9,7.85 h1.8
  text "BUTTON 2" at 83.896,7.786 h1.8
  text "BUTTON 3" at 94.158,7.786 h1.8
  text "GND" at 38.975,7.7 h1.52 r90
  text "VDD / SWD0" at 35,7.206 h1.52 r90
  text "GND" at 48.109,6.577 h1.4
  text "DEBUG OUT" at 3.35,1.325 h1.8
  text "GND" at 48.103,1.123 h1.4
  text "3.6V Max" at 13.05,0.325 h1.4
Bottom Overlay:
  drawing of 375 lines, arcs and shapes, not listed
  text "220-JP8930" at 7.92,52.576 h1.5 r180
  text "P2.00" at 52.359,51.589 h1.91 r180
  text "DIO3" at 59.522,51.589 h1.91 r180
  text "P2.03" at 52.359,48.896 h1.91 r180
  text "DIO2" at 59.547,48.897 h1.91 r180
  text "MEM" at 74.067,48.406 h1.78 r180
  text "P2.04" at 52.359,46.204 h1.91 r180
  text "DIO1" at 59.624,46.204 h1.91 r180
  text "GPIO" at 66.343,44.955 h1.78 r180
  text "P2" at 76.06,43.654 h1.78 r180
  text "P2.02" at 52.384,43.512 h1.91 r180
  text "DIO0" at 59.522,43.488 h1.91 r180
  text "P2.07" at 27.025,41.589 h1.91 r180
  text "SWO" at 34.292,41.601 h1.91 r180
  text "nRF54" at 41.782,41.441 h2.03 r180
  text "DEBUGGER" at 68.931,41.349 h1.4 r180
  text "P2.01" at 52.359,40.819 h1.91 r180
  text "CLK" at 59.674,40.819 h1.91 r180
  text "SWDCLK" at 32.746,39.126 h1.91 r180
  text "P2.05" at 52.359,38.127 h1.91 r180
  text "CS" at 60.284,38.127 h1.91 r180
  text "SWDIO" at 33.493,36.576 h1.91 r180
  text "GPIO" at 51.936,36.054 h1.99 r180
  text "Function" at 57.407,36.054 h1.99 r180
  text "Circuit" at 69.514,35.603 h2.03 r180
  text "DEBUGGER" at 42.334,35.375 h1.4 r180
  text "RESET" at 34.15,33.976 h1.91 r180
  text "BUTTON 3" at 87.496,33.131 h1.91 r180
  text "P0.04" at 82.331,32.511 h1.91 r180
  text "GPIO" at 73.074,31.919 h1.78 r180
  text "P1.07" at 27.042,31.521 h1.91 r180
  text "CTS1" at 34.501,31.527 h1.91 r180
  text "NFC2" at 59.269,30.94 h1.91 r180
  text "P1.03" at 52.309,30.916 h1.91 r180
  text "BUTTON 2" at 87.521,30.46 h1.91 r180
  text "P1.08" at 82.332,29.811 h1.91 r180
  text "0R" at 76.796,29.57 h1.52 r180
  text "P1.06" at 27.042,28.981 h1.91 r180
  text "RTS1" at 34.594,28.987 h1.91 r180
  text "N.C." at 73.171,28.88 h1.52 r180
  text "nRF54" at 41.829,28.413 h2.03 r180
  text "NFC" at 77.938,27.873 h1.78 r180
  text "BUTTON 1" at 87.521,27.756 h1.91 r180
  text "P1.09" at 82.327,27.134 h1.91 r180
  text "P1.04" at 27.042,26.441 h1.91 r180
  text "TXD1" at 34.359,26.442 h1.91 r180
  text "NFC1" at 59.371,25.785 h1.91 r180
  text "P1.02" at 52.309,25.76 h1.91 r180
  text "GPIO" at 96.048,25.636 h1.78 r180
  text "BUTTON 0" at 87.488,25.105 h1.91 r180
  text "PIN" at 74.992,24.777 h1.78 r180
  text "PIN" at 41.681,24.413 h1.78 r180
  text "P1.13" at 82.332,24.411 h1.91 r180
  text "P1.05" at 27.042,23.901 h1.91 r180
  text "RXD1" at 34.347,23.902 h1.91 r180
  text "SB6" at 66.343,21.797 h1.91 r180
  text "P1.14" at 82.327,21.749 h1.91 r180
  text "LED 3" at 89.058,21.736 h1.91 r180
  text "P0.03" at 27.042,21.362 h1.91 r180
  text "CTS0" at 34.234,21.368 h1.91 r180
  text "P1.01" at 52.373,20.411 h1.91 r180
  text "XL2" at 59.892,20.389 h1.91 r180
  text "1M" at 97.086,20.172 h1.52 r180
  text "GPIO" at 73.074,19.375 h1.78 r180
  text "SB4" at 66.343,19.105 h1.91 r180
  text "P2.07" at 82.327,19.057 h1.91 r180
  text "LED 2" at 89.058,19.057 h1.91 r180
  text "P0.02" at 27.042,18.822 h1.91 r180
  text "RTS0" at 34.326,18.828 h1.91 r180
  text "GPIO" at 96.057,17.523 h1.78 r180
  text "DEBUGGER" at 42.379,16.9 h1.4 r180
  text "SB5" at 66.343,16.413 h1.91 r180
  text "P1.10" at 82.327,16.364 h1.91 r180
  text "LED 1" at 89.058,16.341 h1.91 r180
  text "P0.00" at 27.042,16.283 h1.91 r180
  text "TXD0" at 34.091,16.272 h1.91 r180
  text "P1.00" at 52.373,15.026 h1.91 r180
  text "XL1" at 59.993,15.004 h1.91 r180
  text "PIN" at 78.434,14.827 h1.78 r180
  text "LED 0" at 89.07,14.474 h1.91 r180
  text "P0.01" at 27.042,13.743 h1.91 r180
  text "RXD0" at 34.079,13.732 h1.91 r180
  text "SB3" at 66.343,13.72 h1.91 r180
  text "P2.09" at 82.327,13.672 h1.91 r180
  text "P5V0" at 100.398,13.25 h1.52 r180
  text "GPIO" at 51.916,11.631 h1.99 r180
  text "Function" at 57.408,11.631 h1.99 r180
  text "Short" at 66.394,11.631 h1.99 r180
  text "HW" at 74.979,11.606 h1.99 r180
  text "GPIO" at 81.904,11.584 h1.99 r180
  text "Function" at 87.375,11.584 h1.99 r180
  text "HW" at 97.853,11.569 h1.99 r180
  text "GPIO" at 27.016,11.191 h2.03 r180
  text "Function" at 32.899,11.188 h2.03 r180
  text "Circuit" at 43.32,11.182 h2.03 r180
Top Paste:
  circle w1.1: c80.975,30.275 r0.25
Top Solder:
  circle w1.4: c80.975,30.275 r0.25
Board Outline:
  the board outline again, w0.254
PCB Info:
  circle w0.013: c113.104,58.5 r3
  circle w0.013: c113.104,58.5 r3
  circle w0.013: c113.104,58.5 r3
  circle w0.013: c113.104,58.5 r3
  circle w0.013: c113.104,58.5 r3
  circle w0.013: c113.104,58.5 r3
  circle w0.013: c98.969,28.576 r3
  circle w0.013: c98.969,28.576 r3
  circle w0.013: c98.969,28.576 r3
  circle w0.013: c98.969,28.576 r3
  circle w0.013: c98.969,28.576 r3
  circle w0.013: c98.969,28.576 r3
  circle w0.013: c106.004,5 r3
  circle w0.013: c106.004,5 r3
  circle w0.013: c106.004,5 r3
  circle w0.013: c106.004,5 r3
  circle w0.013: c106.004,5 r3
  circle w0.013: c106.004,5 r3
  circle w0.013: c44.004,5 r3
  circle w0.013: c44.004,5 r3
  circle w0.013: c44.004,5 r3
  circle w0.013: c44.004,5 r3
  circle w0.013: c44.004,5 r3
  circle w0.013: c44.004,5 r3
  circle w0.013: c49.35,19.687 r3
  circle w0.013: c49.35,19.687 r3
  circle w0.013: c49.35,19.687 r3
  circle w0.013: c49.35,19.687 r3
  circle w0.013: c49.35,19.687 r3
  circle w0.013: c49.35,19.687 r3
  circle w0.013: c8.004,5 r3
  circle w0.013: c8.004,5 r3
  circle w0.013: c8.004,5 r3
  circle w0.013: c8.004,5 r3
  circle w0.013: c8.004,5 r3
  circle w0.013: c8.004,5 r3
  circle w0.013: c16.425,62.569 r3
  circle w0.013: c16.425,62.569 r3
  circle w0.013: c16.425,62.569 r3
  circle w0.013: c16.425,62.569 r3
  circle w0.013: c16.425,62.569 r3
  circle w0.013: c16.425,62.569 r3
  circle w0.013: c44.004,58.5 r3
  circle w0.013: c44.004,58.5 r3
  circle w0.013: c44.004,58.5 r3
  circle w0.013: c44.004,58.5 r3
  circle w0.013: c44.004,58.5 r3
  circle w0.013: c44.004,58.5 r3
  circle w0.013: c112,29.973 r3.5
  circle w0.013: c112,29.973 r3.5
  circle w0.013: c112,29.973 r3.5
  circle w0.013: c112,29.973 r3.5
  circle w0.013: c35.496,55.973 r3.5
  circle w0.013: c35.496,55.973 r3.5
  circle w0.013: c3.496,3.473 r3.5
  circle w0.013: c3.496,3.473 r3.5
  circle w0.013: c74.996,3.973 r3.5
  circle w0.013: c74.996,3.973 r3.5
  circle w0.013: c108.496,9.973 r3.5
  circle w0.013: c108.496,9.973 r3.5
  circle w0.013: c77.796,58.473 r3.5
  circle w0.013: c77.796,58.473 r3.5
  circle w0.013: c42.496,17.973 r3.5
  circle w0.013: c42.496,17.973 r3.5
  circle w0.013: c20.496,36.973 r3.5
  circle w0.013: c20.496,36.973 r3.5
  circle w0.013: c74.996,3.973 r3.5
  circle w0.013: c74.996,3.973 r3.5
  circle w0.013: c16.496,60.473 r3.5
  circle w0.013: c16.496,60.473 r3.5
  circle w0.013: c42.496,17.973 r3.5
  circle w0.013: c42.496,17.973 r3.5
  circle w0.013: c16.496,60.473 r3.5
  circle w0.013: c16.496,60.473 r3.5
  circle w0.013: c35.496,55.973 r3.5
  circle w0.013: c35.496,55.973 r3.5
  circle w0.013: c20.496,36.973 r3.5
  circle w0.013: c20.496,36.973 r3.5
  circle w0.013: c108.496,9.973 r3.5
  circle w0.013: c108.496,9.973 r3.5
  circle w0.013: c3.496,3.473 r3.5
  circle w0.013: c3.496,3.473 r3.5
  circle w0.013: c77.796,58.473 r3.5
  circle w0.013: c77.796,58.473 r3.5
  circle w0.013: c42.496,17.973 r3.5
  circle w0.013: c42.496,17.973 r3.5
  circle w0.013: c20.496,36.973 r3.5
  circle w0.013: c20.496,36.973 r3.5
  circle w0.013: c112,29.973 r3.5
  circle w0.013: c112,29.973 r3.5
  circle w0.013: c35.496,55.973 r3.5
  circle w0.013: c35.496,55.973 r3.5
  circle w0.013: c16.496,60.473 r3.5
  circle w0.013: c16.496,60.473 r3.5
  circle w0.013: c108.496,9.973 r3.5
  circle w0.013: c108.496,9.973 r3.5
  circle w0.013: c77.796,58.473 r3.5
  circle w0.013: c77.796,58.473 r3.5
  circle w0.013: c3.496,3.473 r3.5
  circle w0.013: c3.496,3.473 r3.5
  circle w0.013: c74.996,3.973 r3.5
  circle w0.013: c74.996,3.973 r3.5
Top Impedance Info:
  lines w0.153: 7.489,24.375 cw(c7.727,24.137) 7.727,24.473 10.361,24.473 cw(c10.361,24.165) 10.579,24.383 ; 7.489,24.875 ccw(c7.727,25.113) 7.727,24.776 10.322,24.776 ccw(c10.322,25.141) 10.579,24.883 ; 11.579,24.383 cw(c11.801,24.161) 11.801,24.475 11.879,24.475 13.05,24.475 13.084,24.475 cw(c13.084,22.81) 14.75,22.81 14.75,21.422 ccw(c16.6,21.422) 16.6,19.572 19.033,19.572 cw(c19.033,19.138) 19.467,19.138 19.467,18.664 19.46,18.664 ; 11.579,24.883 ccw(c11.833,25.137) 11.833,24.778 11.879,24.778 13.05,24.778 13.084,24.778 cw(c13.084,22.81) 15.053,22.81 15.053,21.422 ccw(c16.6,21.422) 16.6,19.875 19.033,19.875 cw(c19.033,19.138) 19.77,19.138 19.77,18.755 ccw(c19.86,18.755) 19.86,18.664
  text "90-ohms grounded coplanar differential" at 7.452,25.664 h0.64
Bottom Placement:
  circle w0.15: c19.122,29.997 r0.95
  circle w0.15: c38.919,42.395 r0.95
  circle w0.15: c26.334,48.26 r0.95
  circle w0.15: c15.447,44.856 r0.95
  circle w0.15: c23.62,4.115 r0.95
  circle w0.15: c20.62,4.115 r0.95
  circle w0.15: c26.62,4.115 r0.95
  circle w0.15: c29.62,4.115 r0.95
  circle w0.15: c16.004,2 r0.95
  circle w0.15: c9.135,12.15 r0.95
  circle w0.15: c10.24,23.113 r0.95
  circle w0.15: c10.24,26.115 r0.95
  circle w0.15: c13.263,23.571 r0.95
  circle w0.15: c16.032,27.61 r0.95
  circle w0.15: c21.797,27.432 r0.95
  circle w0.15: c24.797,28.423 r0.95
  circle w0.15: c27.797,28.423 r0.95
  circle w0.15: c37.215,26.746 r0.95
  circle w0.15: c37.215,21.746 r0.95
  circle w0.15: c37.215,16.746 r0.95
  circle w0.15: c37.215,11.746 r0.95
  circle w0.15: c45.496,13.056 r0.95
  circle w0.15: c9.25,31.75 r0.95
  circle w0.15: c10.24,38.353 r0.95
  circle w0.15: c10.24,41.353 r0.95
  circle w0.15: c13.263,38.845 r0.95
  circle w0.15: c32.034,37.567 r0.95
  circle w0.15: c37.418,38.711 r0.95
  circle w0.15: c38.104,47.219 r0.95
  circle w0.15: c36.174,49.2 r0.95
  circle w0.15: c10.698,48.92 r0.95
  circle w0.15: c14.533,54.305 r0.95
  circle w0.15: c18.622,57.582 r0.95
  circle w0.15: c22.077,54.813 r0.95
  circle w0.15: c26.877,54.915 r0.95
  circle w0.15: c23.372,58.039 r0.95
  text "Circles mark PCA10145 v0.9.0 test point locations" at 9.793,61.805 h0.6

## Dimensions
0.029,63.5 to 12.6,58.5 on Dimension
0,0 to 8.004,5 on Dimension
0,63.856 to 12.6,58.5 on Dimension
0,0 to 8,5 on Dimension
113.104,58.5 to 106.004,5 on Dimension
44.004,5 to 106.004,5 on Dimension
8.004,5 to 44.004,5 on Dimension
44.004,58.5 to 113.104,58.5 on Dimension
12.604,58.5 to 44.004,58.5 on Dimension
0,0 to 0,63.5 on Dimension
0,0 to 117.004,0 on Dimension

## Text inside footprints (layer, text, board x,y; h text height)
J3: Top Placement "Board Edge" at 0.685,26.154 h0.38 r270
LOGO3: Bottom Overlay "S" at 33.491,58.797 h1.35 r180; Bottom Overlay "E" at 34.381,58.797 h1.35 r180; Bottom Overlay "G" at 35.165,58.797 h1.35 r180; Bottom Overlay "G" at 36.156,58.797 h1.35 r180; Bottom Overlay "E" at 37.179,58.797 h1.35 r180; Bottom Overlay "R" at 38.015,58.797 h1.35 r180; Bottom Overlay "TM" at 33.278,60.235 h0.94 r180; Bottom Overlay "www.segger.com" at 29.889,61.807 h1.68 r180; Bottom Overlay "J-Link" at 29.808,60.657 h1.45 r180; Bottom Overlay "Technology" at 34.56,60.657 h1.45 r180
S1: Bottom Overlay "R" at 6.488,52.525 h1.3 r180